# Altium PCB DC-DC_30KW_BUCK-BOOST.PcbDoc (part 2 of 2)
Units mm, origin at the board's own origin, x right, y up, seen from the top; angles counter-clockwise.
Board outline 250 x 400 mm, 4 copper layers (Top Layer 1, Top Layer, Bottom Layer, Bottom Layer 1), stack 0.603 mm thick; 286 components, 138 nets, 777 pads, 13 vias.
Unrouted connection lines stored in the file: 310.
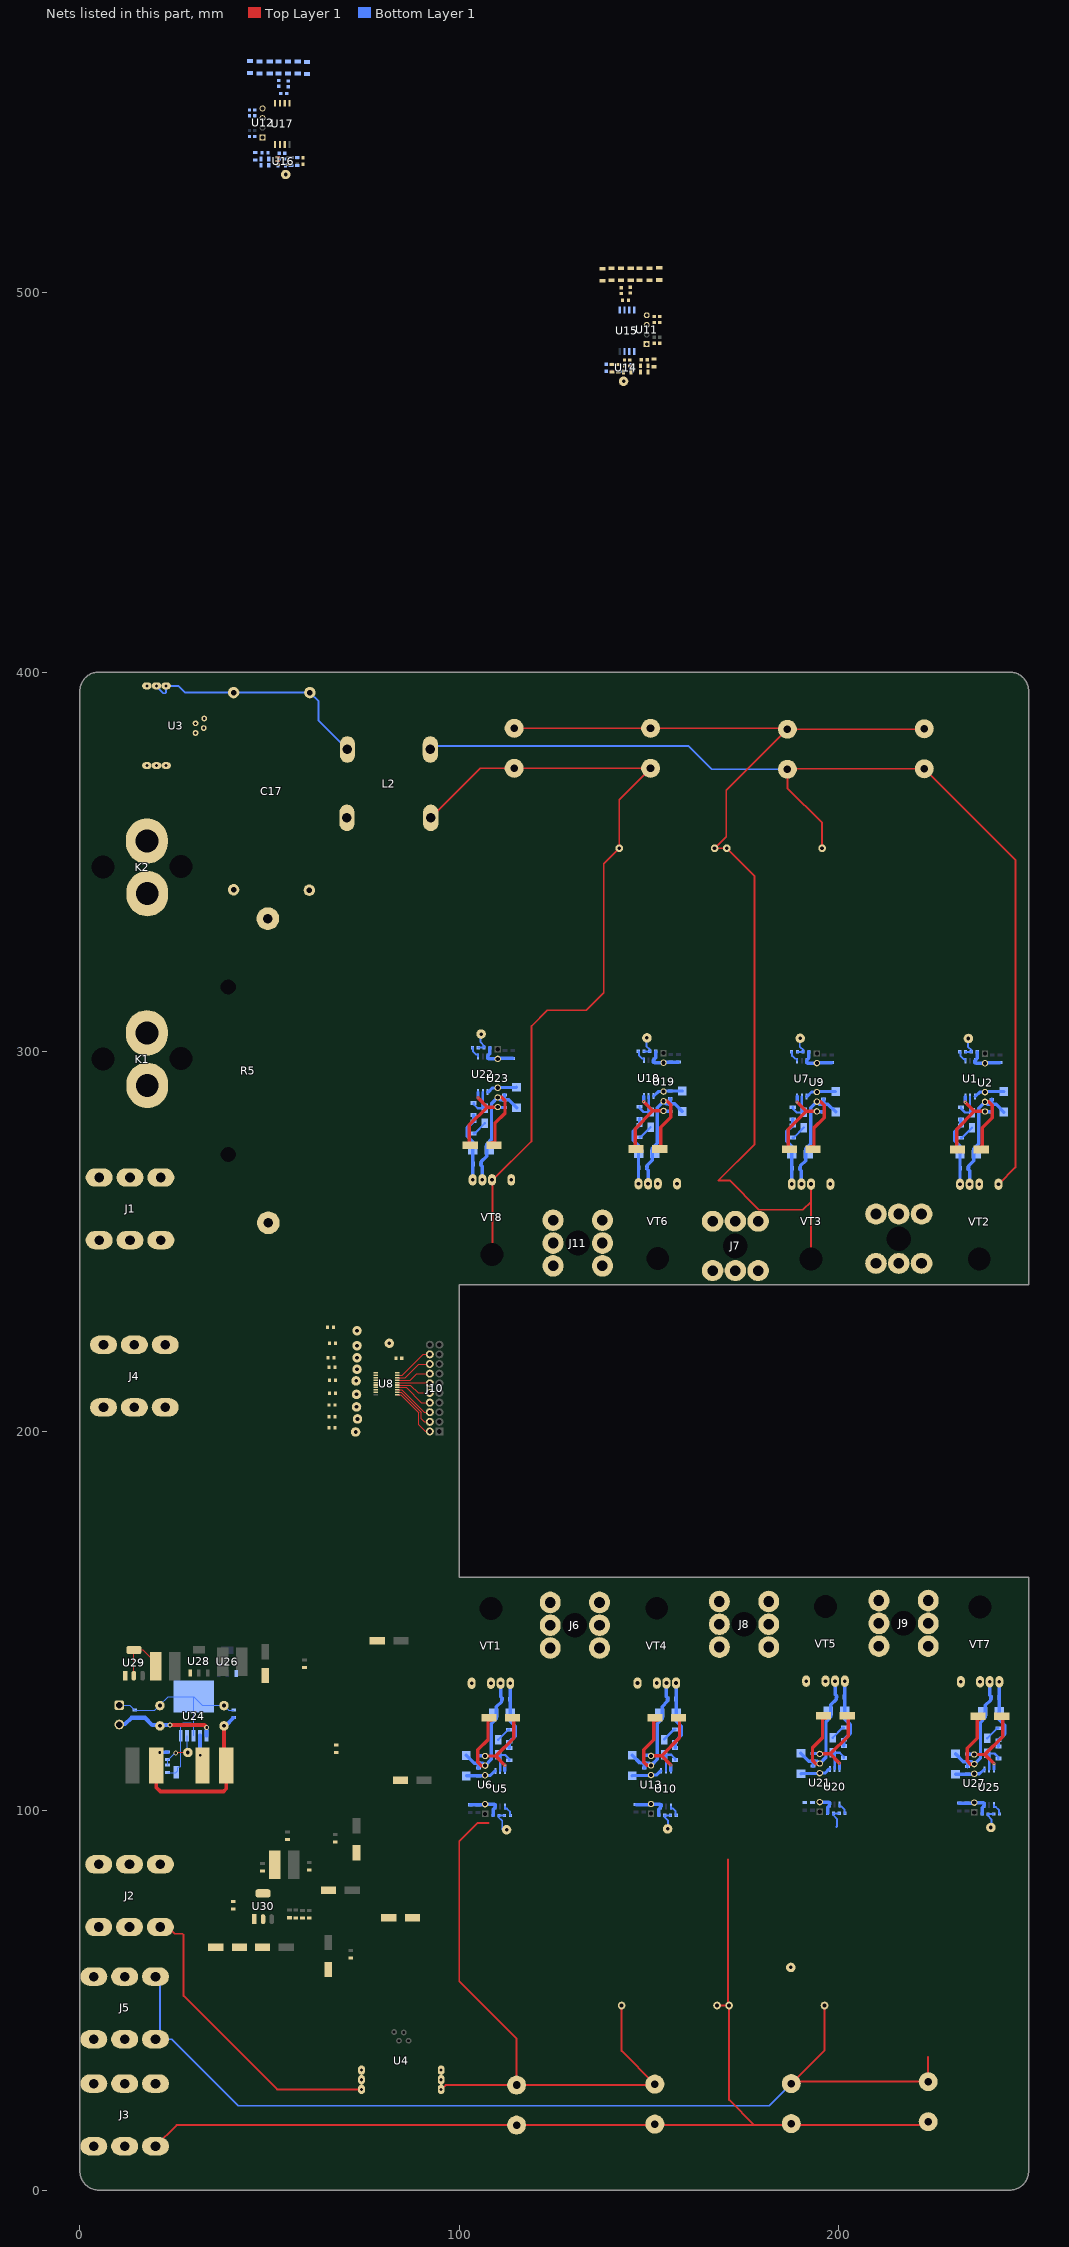
[diagram p3: the nets of this part, all layers, seen from the top]

## Via types
v1: diameter 0.6, hole 0.25, Top Layer 1 to Bottom Layer 1, tented both sides, 8 vias
v2: diameter 1.27, hole 0.711, Top Layer 1 to Bottom Layer 1, 5 vias

## Nets (pads, with @x,y where several pads share a name; then routed paths per layer and width w, separated by ;. In a path a pad name is that pad's centre, name@x,y a point inside that pad or via, vN(x,y) a via of type N, cw(c..) or ccw(c..) an arc to the next point about the centre after c; other vN are vias at no path point) (continued)
GND: C4.1 C12.1 C21.1 C23.1 C27.1 C29.1 C33.1 C36.1 C38.1 C39.1 C40.1 C41.1 C43.1 C44.1 C45.1 C47.1 C52.1 C53.1 C56.1 C57.1 C61.1 C63.1 C67.1 C69.1 C73.1 C74.2 C76.1 C77.1 C79.1 C80.1 C81.2 C84.1 C86.1 C87.1 C88.1 C89.2 C92.1 C93.2 C94.2 C95.1 C96.1 C97.2 C98.1 C99.2 C100.2 C101.1 C102.1 C103.2 C104.2 C105.1 C106.2 C107.1 C108.1 D15.2 P1.1 R14.1 R15.1 R16.1 R17.1 R18.1 R19.1 R20.1 R21.1 R22.1 R23.1 R24.1 R25.1 R26.1 R27.1 R28.1 R29.1 R30.1 R31.1 R52.1 R53.1 R77.1 U1.3 U2.2 U3.3 U5.3 U6.2 U7.3 U8.10 U9.2 U10.3 U11.1 U12.1 U13.2 U14.2 U15.5 U16.2 U17.5 U18.3 U19.2 U20.3 U21.2 U22.3 U23.2 U24.3 U24.5 U24.6 U25.3 U26.1 U27.2 U28.1 U29.1 U30.1 | length 138.6
  Bottom Layer 1 w0.3: P1.1@10.375,127.762 13.192,127.762 C77.1@14.478,126.476 19.669,126.476 21.082,127.889 23.251,130.058 U24.6@29.972,130.058 ; R77.1@23.114,109.998 23.13,109.982 23.495,109.982 23.511,109.998 25.289,109.998 D15.2@25.4,110.109 25.838,110.547 25.838,111.341 26.01,111.513 26.392,111.513 26.568,111.689 U24.5@26.568,119.753 26.568,122.58 27.178,123.19 29.21,123.19 29.972,122.428 ; U24.3@29.972,119.753 29.972,122.428 ; C79.1@40.513,126.476 39.259,126.476 37.973,127.762 32.268,127.762 U24.6@29.972,130.058 ; 29.972,122.428 U24.6@29.972,130.058
  Bottom Layer 1 w0.9: C69.1@102.856,101.545 C67.1@104.888,101.545 106.778,101.545 U6.2@106.921,101.688 ; U6.2@106.794,101.688 U6.2@106.921,101.688 ; R15.1@108.031,301.038 108.031,299.436 107.625,299.031 107.625,298.902 U22.3@107.442,298.719 107.442,298.224 107.459,298.207 107.629,298.207 107.752,298.084 U23.2@109.982,298.084 ; R20.1@108.872,98.733 108.872,100.335 109.277,100.741 109.277,100.869 U5.3@109.461,101.053 109.461,101.548 109.444,101.565 109.274,101.565 109.151,101.688 U6.2@106.921,101.688 ; U23.2@110.109,298.084 U23.2@109.982,298.084 ; C87.1@114.046,298.227 C84.1@112.014,298.227 110.125,298.227 U23.2@109.982,298.084 ; C63.1@146.558,101.584 C61.1@148.59,101.584 150.479,101.584 U13.2@150.622,101.727 ; U13.2@150.495,101.727 U13.2@150.622,101.727 ; R17.1@151.719,300.022 151.719,298.42 151.313,298.015 151.313,297.886 U18.3@151.13,297.703 151.13,297.208 151.147,297.191 151.317,297.191 151.44,297.068 U19.2@153.67,297.068 ; R18.1@152.573,98.773 152.573,100.375 152.979,100.78 152.979,100.909 U10.3@153.162,101.092 153.162,101.587 153.145,101.604 152.975,101.604 152.852,101.727 U13.2@150.622,101.727 ; U19.2@153.797,297.068 U19.2@153.67,297.068 ; C76.1@157.734,297.211 C73.1@155.702,297.211 153.813,297.211 U19.2@153.67,297.068 ; R19.1@192.105,299.913 192.105,298.311 191.699,297.906 191.699,297.777 U7.3@191.516,297.594 191.516,297.099 191.533,297.082 191.703,297.082 191.826,296.959 U9.2@194.056,296.959 ; U9.2@194.183,296.959 U9.2@194.056,296.959 ; U21.2@194.945,102.235 197.302,102.235 197.425,102.112 197.595,102.112 197.612,102.095 U20.3@197.612,101.6 197.429,101.417 197.429,101.288 197.023,100.883 R16.1@197.023,99.281 ; C47.1@198.12,297.102 C43.1@196.088,297.102 194.199,297.102 U9.2@194.056,296.959 ; C21.1@231.734,101.947 C12.1@233.766,101.947 235.655,101.947 U27.2@235.798,102.09 ; U27.2@235.671,102.09 U27.2@235.798,102.09 ; R21.1@236.428,299.88 236.428,298.278 236.022,297.873 236.022,297.744 U1.3@235.839,297.561 235.839,297.066 235.856,297.049 236.026,297.049 236.149,296.926 U2.2@238.379,296.926 ; R14.1@237.749,99.135 237.749,100.737 238.155,101.143 238.155,101.271 U25.3@238.338,101.455 238.338,101.95 238.321,101.967 238.151,101.967 238.028,102.09 U27.2@235.798,102.09 ; U2.2@238.506,296.926 U2.2@238.379,296.926 ; C27.1@242.443,297.069 C23.1@240.411,297.069 238.522,297.069 U2.2@238.379,296.926
"Net       _1": ?.1 VT2.2 VT3.1
NetC1_1: C1.1 C3.1 C7.2 C8.2 C16.1 C19.2 J3.1 J8.1 VT4.2 VT5.1 | length 282.4
  Top Layer 1 w0.5: J3.1@19.914,11.557 25.502,17.145 C8.2@115.062,17.145 177.673,17.145 ; C16.1@167.767,48.641 C16.1@167.894,48.641 C19.2@171.069,48.641 ; 170.815,87.122 170.815,48.895 C19.2@171.069,48.641 ; C3.1@223.52,18.034 222.631,17.145 177.673,17.145 ; C19.2@171.069,48.641 171.069,23.749 177.673,17.145
NetC1_2: C1.2 C3.2 C19.1 J5.1 R63.1 VT7.2 | length 259.9
  Top Layer 1 w0.5: C19.1@196.215,48.641 196.215,36.83 187.96,28.575 C3.2@223.52,28.575 223.52,35.052
  Bottom Layer 1 w0.5: J5.1@19.812,39.751 J5.1@21.082,39.751 ; J5.1@19.812,56.261 21.082,54.991 J5.1@21.082,39.751 ; C1.2@187.452,28.067 181.61,22.225 41.783,22.225 24.257,39.751 J5.1@21.082,39.751
NetC2_1: C2.1 C9.2 C13.1 C14.2 D2.1 R4.2 U2.6 VT2.3 | length 46.4
  Top Layer 1 w0.9: C9.2@236.885,274.858 237.733,274.858 237.769,274.893 237.769,279.933 240.411,282.575 240.411,285.877 239.522,286.766 U2.6@238.506,286.766
  Bottom Layer 1 w0.9: R4.2@234.045,269.24 234.045,269.015 234.442,268.618 VT2.3@234.442,265.049 ; R4.2@234.061,269.24 234.195,269.374 234.195,269.882 235.569,271.256 235.569,274.431 236.855,275.717 236.855,285.115 U2.6@238.506,286.766 239.157,286.115 C2.1@240.284,286.115 ; C14.2@240.284,287.433 C2.1@240.284,286.115 ; C13.1@243.459,284.066 241.41,286.115 C2.1@240.284,286.115
NetC2_2: C2.2 C9.1 U1.6 U2.7 | length 21.5
  Top Layer 1 w0.9: C9.1@231.14,274.32 231.013,274.447 231.013,279.527 235.712,284.226 ; v1(233.299,286.639) 235.712,284.226 ; U2.7@238.506,284.226 235.712,284.226
  Bottom Layer 1 w0.9: v1(233.299,286.639) U1.6@233.299,288.163 ; U2.7@238.506,284.226 238.617,284.115 C2.2@240.284,284.115
NetC5_1: C5.1 C10.1 C15.2 L2.4 VT2.1 | length 279
  Top Layer 1 w0.5: C15.2@195.58,353.568 195.58,360.299 186.436,369.443 C5.1@186.436,374.396 186.563,374.523 C10.1@222.504,374.523 246.507,350.52 246.507,269.494 VT2.1@242.062,265.049
  Bottom Layer 1 w0.5: L2.4@92.329,379.603 93.218,380.492 160.401,380.492 166.497,374.396 C5.1@186.436,374.396
NetC5_2: C5.2 C6.1 C10.2 C11.1 C15.1 C18.2 J7.1 VT3.2 VT6.1 | length 293.4
  Top Layer 1 w0.5: C11.1@114.427,385.191 C6.1@150.368,385.191 186.182,385.191 C5.2@186.436,384.937 ; VT3.2@192.659,245.382 192.659,260.477 ; VT3.2@192.659,265.082 192.659,260.477 ; C10.2@222.504,385.064 222.377,384.937 C5.2@186.436,384.937 ; C5.2@186.436,384.937 170.307,368.808 170.307,356.616 C18.2@167.259,353.568 C15.1@170.434,353.568 177.8,346.202 177.8,275.59 168.275,266.065 171.196,266.065 178.943,258.318 190.5,258.318 192.659,260.477
NetC6_2: C6.2 C11.2 C18.1 L2.2 VT8.2 | length 217.1
  Top Layer 1 w0.5: L2.2@92.456,361.569 105.537,374.65 C11.2@114.427,374.65 C6.2@150.368,374.65 142.113,366.395 C18.1@142.113,353.568 138.049,349.504 138.049,315.468 133.477,310.896 123.19,310.896 118.999,306.705 118.999,276.352 108.712,266.065 VT8.2@108.712,246.253 ; VT8.2@108.272,246.565 VT8.2@108.272,248.612
NetC7_1: C7.1 C8.1 C16.2 U4.8 U4.9 U4.10 VT1.1 | length 161.4
  Top Layer 1 w0.5: U4.8@95.209,26.543 96.352,27.686 C8.1@115.062,27.686 ; 107.637,96.705 104.706,96.705 99.949,91.948 99.949,54.991 115.062,39.878 C8.1@115.062,27.686 ; C16.2@142.748,48.641 142.748,36.703 C7.1@151.511,27.94 151.257,27.686 C8.1@115.062,27.686
NetC13_2: C13.2 C14.1 U1.4 U2.5 | length 8.2
  Bottom Layer 1 w0.8: U1.4@235.839,288.163 235.966,288.163 237.109,289.306 U2.5@238.506,289.306 238.633,289.433 C14.1@240.284,289.433 243.426,289.433 C13.2@243.459,289.466
NetC17_1: C17.1 J4.1 L2.1 R62.1
NetC17_2: C17.2 L2.3 U3.5 U3.6 U3.7 | length 62.9
  Bottom Layer 1 w0.5: U3.6@20.193,396.367 20.792,395.768 20.792,395.658 22.026,394.424 22.44,394.424 22.733,394.717 U3.5@22.733,396.367 25.929,396.367 27.707,394.589 C17.2@40.513,394.589 C17.2@60.579,394.589 62.909,392.259 62.909,387.179 L2.3@70.485,379.603
NetC20_1: C20.1 C22.2 C24.1 C25.2 D4.1 R9.2 U6.6 VT1.3 | length 46.4
  Top Layer 1 w0.9: U6.6@106.794,111.848 105.778,111.848 104.889,112.737 104.889,116.039 107.531,118.681 107.531,123.721 107.566,123.756 C22.2@108.415,123.756
  Bottom Layer 1 w0.9: C24.1@101.841,114.548 103.89,112.499 C20.1@105.016,112.499 ; C25.2@105.016,111.181 C20.1@105.016,112.499 ; VT1.3@110.858,133.565 110.858,129.996 111.255,129.599 R9.2@111.255,129.374 ; R9.2@111.239,129.374 111.105,129.24 111.105,128.732 109.731,127.358 109.731,125.691 109.731,124.183 108.445,122.897 108.445,113.499 U6.6@106.794,111.848 106.143,112.499 C20.1@105.016,112.499
NetC20_2: C20.2 C22.1 U5.6 U6.7 | length 21.5
  Top Layer 1 w0.9: U6.7@106.794,114.388 109.588,114.388 ; v1(112.001,111.975) 109.588,114.388 ; C22.1@114.16,124.294 114.287,124.167 114.287,119.087 109.588,114.388
  Bottom Layer 1 w0.9: C20.2@105.016,114.499 106.683,114.499 U6.7@106.794,114.388 ; U5.6@112.001,110.451 v1(112.001,111.975)
NetC24_2: C24.2 C25.1 U5.4 U6.5 | length 8.2
  Bottom Layer 1 w0.8: C24.2@101.841,109.148 101.874,109.181 C25.1@105.016,109.181 106.667,109.181 U6.5@106.794,109.308 108.191,109.308 109.334,110.451 U5.4@109.461,110.451
NetC26_1: C26.1 C28.2 C30.1 C31.2 D6.1 R13.2 U9.6 VT3.3 | length 46.4
  Top Layer 1 w0.9: C28.2@192.562,274.891 193.41,274.891 193.446,274.926 193.446,279.966 196.088,282.608 196.088,285.91 195.199,286.799 U9.6@194.183,286.799
  Bottom Layer 1 w0.9: R13.2@189.722,269.273 189.722,269.048 190.119,268.651 VT3.3@190.119,265.082 ; R13.2@189.738,269.273 189.872,269.407 189.872,269.915 191.246,271.289 191.246,274.464 192.532,275.75 192.532,285.148 U9.6@194.183,286.799 194.834,286.148 C26.1@195.961,286.148 ; C31.2@195.961,287.466 C26.1@195.961,286.148 ; C30.1@199.136,284.099 197.087,286.148 C26.1@195.961,286.148
NetC26_2: C26.2 C28.1 U7.6 U9.7 | length 21.5
  Top Layer 1 w0.9: C28.1@186.817,274.353 186.69,274.48 186.69,279.56 191.389,284.259 ; v1(188.976,286.672) 191.389,284.259 ; U9.7@194.183,284.259 191.389,284.259
  Bottom Layer 1 w0.9: v1(188.976,286.672) U7.6@188.976,288.196 ; U9.7@194.183,284.259 194.294,284.148 C26.2@195.961,284.148
NetC30_2: C30.2 C31.1 U7.4 U9.5 | length 8.2
  Bottom Layer 1 w0.8: U7.4@191.516,288.196 191.643,288.196 192.786,289.339 U9.5@194.183,289.339 194.31,289.466 C31.1@195.961,289.466 199.103,289.466 C30.2@199.136,289.499
NetC32_1: C32.1 C34.1 C54.1 R54.1 U11.3 U15.3 U15.4
NetC32_2: C32.2 C34.2 U11.4 U15.1
NetC35_1: C35.1 C37.1 C55.1 R55.1 U12.3 U17.3 U17.4
NetC35_2: C35.2 C37.2 U12.4 U17.1
NetC42_1: C42.1 C46.2 C49.1 C51.2 D8.1 R39.2 U13.6 VT4.3 | length 46.4
  Top Layer 1 w0.9: U13.6@150.495,111.887 149.479,111.887 148.59,112.776 148.59,116.078 151.232,118.72 151.232,123.76 151.268,123.795 C46.2@152.116,123.795
  Bottom Layer 1 w0.9: C49.1@145.542,114.587 147.591,112.538 C42.1@148.717,112.538 ; C51.2@148.717,111.22 C42.1@148.717,112.538 ; VT4.3@154.559,133.604 154.559,130.035 154.956,129.638 R39.2@154.956,129.413 ; R39.2@154.94,129.413 154.806,129.279 154.806,128.771 153.432,127.397 153.432,124.222 152.146,122.936 152.146,113.538 U13.6@150.495,111.887 149.844,112.538 C42.1@148.717,112.538
NetC42_2: C42.2 C46.1 U10.6 U13.7 | length 21.5
  Top Layer 1 w0.9: U13.7@150.495,114.427 153.289,114.427 ; v1(155.702,112.014) 153.289,114.427 ; C46.1@157.861,124.333 157.988,124.206 157.988,119.126 153.289,114.427
  Bottom Layer 1 w0.9: C42.2@148.717,114.538 150.384,114.538 U13.7@150.495,114.427 ; U10.6@155.702,110.49 v1(155.702,112.014)
NetC48_1: C48.1 C58.2 R50.1 R58.2 U14.4
NetC48_2: C48.2 C56.2 R42.1 R52.2 TP19.1 U14.3
NetC49_2: C49.2 C51.1 U10.4 U13.5 | length 8.2
  Bottom Layer 1 w0.8: C49.2@145.542,109.187 145.575,109.22 C51.1@148.717,109.22 150.368,109.22 U13.5@150.495,109.347 151.892,109.347 153.035,110.49 U10.4@153.162,110.49
NetC50_1: C50.1 C59.2 R51.1 R59.2 U16.4
NetC50_2: C50.2 C57.2 R43.1 R53.2 TP20.1 U16.3
NetC52_2: C52.2 R44.1
NetC53_2: C53.2 R45.1
NetC54_2: C54.2 R46.1 U15.2
NetC55_2: C55.2 R47.1 U17.2
NetC58_1: C58.1 R44.2 R58.1 U14.1
NetC59_1: C59.1 R45.2 R59.1 U16.1
NetC60_1: C60.1 C62.2 C64.1 C65.2 D10.1 R67.2 U19.6 VT6.3 | length 46.4
  Top Layer 1 w0.9: C62.2@152.176,275 153.024,275 153.06,275.035 153.06,280.075 155.702,282.717 155.702,286.019 154.813,286.908 U19.6@153.797,286.908
  Bottom Layer 1 w0.9: R67.2@149.336,269.382 149.336,269.157 149.733,268.76 VT6.3@149.733,265.191 ; R67.2@149.352,269.382 149.486,269.516 149.486,270.024 150.86,271.398 150.86,274.573 152.146,275.859 152.146,285.257 U19.6@153.797,286.908 154.448,286.257 C60.1@155.575,286.257 ; C65.2@155.575,287.575 C60.1@155.575,286.257 ; C64.1@158.75,284.208 156.701,286.257 C60.1@155.575,286.257
NetC60_2: C60.2 C62.1 U18.6 U19.7 | length 21.5
  Top Layer 1 w0.9: C62.1@146.431,274.462 146.304,274.589 146.304,279.669 151.003,284.368 ; v1(148.59,286.781) 151.003,284.368 ; U19.7@153.797,284.368 151.003,284.368
  Bottom Layer 1 w0.9: v1(148.59,286.781) U18.6@148.59,288.305 ; U19.7@153.797,284.368 153.908,284.257 C60.2@155.575,284.257
NetC64_2: C64.2 C65.1 U18.4 U19.5 | length 8.2
  Bottom Layer 1 w0.8: U18.4@151.13,288.305 151.257,288.305 152.4,289.448 U19.5@153.797,289.448 153.924,289.575 C65.1@155.575,289.575 158.717,289.575 C64.2@158.75,289.608
NetC66_1: C66.1 C68.2 C70.1 C71.2 D12.1 R71.2 U21.6 VT5.3 | length 46.4
  Top Layer 1 w0.9: U21.6@194.945,112.395 193.929,112.395 193.04,113.284 193.04,116.586 195.682,119.228 195.682,124.268 195.718,124.303 C68.2@196.566,124.303
  Bottom Layer 1 w0.9: C70.1@189.992,115.095 192.041,113.046 C66.1@193.167,113.046 ; C71.2@193.167,111.728 C66.1@193.167,113.046 ; VT5.3@199.009,134.112 199.009,130.543 199.406,130.146 R71.2@199.406,129.921 ; R71.2@199.39,129.921 199.256,129.787 199.256,129.279 197.882,127.905 197.882,124.73 196.596,123.444 196.596,114.046 U21.6@194.945,112.395 194.294,113.046 C66.1@193.167,113.046
NetC66_2: C66.2 C68.1 U20.6 U21.7 | length 21.5
  Top Layer 1 w0.9: U21.7@194.945,114.935 197.739,114.935 ; v1(200.152,112.522) 197.739,114.935 ; C68.1@202.311,124.841 202.438,124.714 202.438,119.634 197.739,114.935
  Bottom Layer 1 w0.9: C66.2@193.167,115.046 194.834,115.046 U21.7@194.945,114.935 ; U20.6@200.152,110.998 v1(200.152,112.522)
NetC70_2: C70.2 C71.1 U20.4 U21.5 | length 8.2
  Bottom Layer 1 w0.8: C70.2@189.992,109.695 190.025,109.728 C71.1@193.167,109.728 194.818,109.728 U21.5@194.945,109.855 196.342,109.855 197.485,110.998 U20.4@197.612,110.998
NetC72_1: C72.1 C75.2 C78.1 C82.2 D14.1 R75.2 U23.6 VT8.3 | length 46.4
  Top Layer 1 w0.9: C75.2@108.488,276.016 109.336,276.016 109.372,276.051 109.372,281.091 112.014,283.733 112.014,287.035 111.125,287.924 U23.6@110.109,287.924
  Bottom Layer 1 w0.9: R75.2@105.648,270.398 105.648,270.173 106.045,269.776 VT8.3@106.045,266.207 ; R75.2@105.664,270.398 105.798,270.532 105.798,271.04 107.172,272.414 107.172,274.081 107.172,275.589 108.458,276.875 108.458,286.273 U23.6@110.109,287.924 110.76,287.273 C72.1@111.887,287.273 ; C82.2@111.887,288.591 C72.1@111.887,287.273 ; C78.1@115.062,285.224 113.013,287.273 C72.1@111.887,287.273
NetC72_2: C72.2 C75.1 U22.6 U23.7 | length 21.5
  Top Layer 1 w0.9: C75.1@102.743,275.478 102.616,275.605 102.616,280.685 107.315,285.384 ; v1(104.902,287.797) 107.315,285.384 ; U23.7@110.109,285.384 107.315,285.384
  Bottom Layer 1 w0.9: v1(104.902,287.797) U22.6@104.902,289.321 ; U23.7@110.109,285.384 110.22,285.273 C72.2@111.887,285.273
NetC78_2: C78.2 C82.1 U22.4 U23.5 | length 8.2
  Bottom Layer 1 w0.8: U22.4@107.442,289.321 107.569,289.321 108.712,290.464 U23.5@110.109,290.464 110.236,290.591 C82.1@111.887,290.591 115.029,290.591 C78.2@115.062,290.624
NetC79_2: C79.2 C81.1 L4.2 L5.1 R76.2 | length 47.3
  Top Layer 1 w1: L5.1@20.143,111.887 20.143,106.095 21.209,105.029 37.846,105.029 38.558,105.741 L4.2@38.558,111.887 37.973,112.472 C81.1@37.973,122.333 C81.1@37.973,122.428
  Bottom Layer 1 w1: v2(21.082,115.316) 21.138,115.372 R76.2@23.059,115.372 ; C81.1@37.973,122.428 38.465,122.428 C79.2@40.513,124.476
NetC83_1: C83.1 C85.2 C90.1 C91.2 D17.1 R81.2 U27.6 VT7.3 | length 46.4
  Top Layer 1 w0.9: U27.6@235.671,112.25 234.655,112.25 233.766,113.139 233.766,116.441 236.409,119.083 236.409,124.123 236.444,124.158 C85.2@237.292,124.158
  Bottom Layer 1 w0.9: C90.1@230.718,114.95 232.767,112.901 C83.1@233.893,112.901 ; C91.2@233.893,111.583 C83.1@233.893,112.901 ; VT7.3@239.735,133.967 239.735,130.398 240.132,130.001 R81.2@240.132,129.776 ; R81.2@240.116,129.776 239.982,129.642 239.982,129.134 238.608,127.76 238.608,124.585 237.322,123.299 237.322,113.901 U27.6@235.671,112.25 235.02,112.901 C83.1@233.893,112.901
NetC83_2: C83.2 C85.1 U25.6 U27.7 | length 21.5
  Top Layer 1 w0.9: U27.7@235.671,114.79 238.465,114.79 ; v1(240.878,112.377) 238.465,114.79 ; C85.1@243.037,124.696 243.164,124.569 243.164,119.489 238.465,114.79
  Bottom Layer 1 w0.9: C83.2@233.893,114.901 235.56,114.901 U27.7@235.671,114.79 ; U25.6@240.878,110.853 v1(240.878,112.377)
NetC90_2: C90.2 C91.1 U25.4 U27.5 | length 8.2
  Bottom Layer 1 w0.8: C90.2@230.718,109.55 230.751,109.583 C91.1@233.893,109.583 235.544,109.583 U27.5@235.671,109.71 237.068,109.71 238.211,110.853 U25.4@238.338,110.853
NetC99_1: C99.1 C101.2 L7.1 U29.2 | length 14.8
  Top Layer 1 w0.3: U29.2@14.224,135.543 U29.2@14.224,142.333 16.544,142.333 19.979,138.898 L7.1@19.979,138.049
NetC106_1: C106.1 C107.2 L8.1 U30.2
NetD1_1: D1.1 R3.2 U1.5 | length 8.1
  Bottom Layer 1 w0.6: R3.2@232.156,285.318 232.156,284.988 233.204,283.94 D1.1@235.077,283.94 234.569,284.448 U1.5@234.569,288.163
NetD1_2: D1.2 R1.2 | length 4
  Bottom Layer 1 w0.6: R1.2@232.156,277.292 232.429,277.292 D1.2@235.077,279.94
NetD2_2: D2.2 R1.1 R3.1 R4.1 VT2.4 | length 18.3
  Bottom Layer 1 w0.9: VT2.4@231.902,265.049 231.902,269.24 231.902,270.891 231.902,275.082 230.505,276.479 230.505,278.841 R1.1@232.156,280.492 R3.1@232.156,282.118
NetD3_1: D3.1 R8.2 U5.5 | length 8.1
  Bottom Layer 1 w0.6: U5.5@110.731,110.451 110.731,114.166 D3.1@110.223,114.674 112.096,114.674 113.144,113.626 R8.2@113.144,113.296
NetD3_2: D3.2 R6.2 | length 4
  Bottom Layer 1 w0.6: D3.2@110.223,118.674 112.871,121.322 R6.2@113.144,121.322
NetD4_2: D4.2 R6.1 R8.1 R9.1 VT1.4 | length 18.3
  Bottom Layer 1 w0.9: R8.1@113.144,116.496 R6.1@113.144,118.122 114.795,119.773 114.795,122.135 113.398,123.532 113.398,125.691 113.398,127.723 113.398,129.374 VT1.4@113.398,133.565
NetD5_1: D5.1 R12.2 U7.5 | length 8.1
  Bottom Layer 1 w0.6: R12.2@187.833,285.351 187.833,285.021 188.881,283.973 D5.1@190.754,283.973 190.246,284.481 U7.5@190.246,288.196
NetD5_2: D5.2 R10.2 | length 4
  Bottom Layer 1 w0.6: R10.2@187.833,277.325 188.106,277.325 D5.2@190.754,279.973
NetD6_2: D6.2 R10.1 R12.1 R13.1 VT3.4 | length 18.3
  Bottom Layer 1 w0.9: VT3.4@187.579,265.082 187.579,269.273 187.579,270.924 187.579,275.115 186.182,276.512 186.182,278.874 R10.1@187.833,280.525 R12.1@187.833,282.151
NetD7_1: D7.1 R36.2 U10.5 | length 8.1
  Bottom Layer 1 w0.6: U10.5@154.432,110.49 154.432,114.205 D7.1@153.924,114.713 155.797,114.713 156.845,113.665 R36.2@156.845,113.335
NetD7_2: D7.2 R34.2 | length 4
  Bottom Layer 1 w0.6: D7.2@153.924,118.713 156.572,121.361 R34.2@156.845,121.361
NetD8_2: D8.2 R34.1 R36.1 R39.1 VT4.4 | length 18.3
  Bottom Layer 1 w0.9: R36.1@156.845,116.535 R34.1@156.845,118.161 158.496,119.812 158.496,122.174 157.099,123.571 157.099,127.762 157.099,129.413 VT4.4@157.099,133.604
NetD9_1: D9.1 R66.2 U18.5 | length 8.1
  Bottom Layer 1 w0.6: R66.2@147.447,285.46 147.447,285.13 148.495,284.082 D9.1@150.368,284.082 149.86,284.59 U18.5@149.86,288.305
NetD9_2: D9.2 R64.2 | length 4
  Bottom Layer 1 w0.6: R64.2@147.447,277.434 147.72,277.434 D9.2@150.368,280.082
NetD10_2: D10.2 R64.1 R66.1 R67.1 VT6.4 | length 18.3
  Bottom Layer 1 w0.9: VT6.4@147.193,265.191 147.193,269.382 147.193,271.033 147.193,275.224 145.796,276.621 145.796,278.983 R64.1@147.447,280.634 R66.1@147.447,282.26
NetD11_1: D11.1 R70.2 U20.5 | length 8.1
  Bottom Layer 1 w0.6: U20.5@198.882,110.998 198.882,114.713 D11.1@198.374,115.221 200.247,115.221 201.295,114.173 R70.2@201.295,113.843
NetD11_2: D11.2 R68.2 | length 4
  Bottom Layer 1 w0.6: D11.2@198.374,119.221 201.022,121.869 R68.2@201.295,121.869
NetD12_2: D12.2 R68.1 R70.1 R71.1 VT5.4 | length 18.3
  Bottom Layer 1 w0.9: R70.1@201.295,117.043 R68.1@201.295,118.669 202.946,120.32 202.946,122.682 201.549,124.079 201.549,128.27 201.549,129.921 VT5.4@201.549,134.112
NetD13_1: D13.1 R74.2 U22.5 | length 8.1
  Bottom Layer 1 w0.6: R74.2@103.759,286.476 103.759,286.146 104.807,285.098 D13.1@106.68,285.098 106.172,285.606 U22.5@106.172,289.321
NetD13_2: D13.2 R72.2 | length 4
  Bottom Layer 1 w0.6: R72.2@103.759,278.45 104.032,278.45 D13.2@106.68,281.098
NetD14_2: D14.2 R72.1 R74.1 R75.1 VT8.4 | length 18.3
  Bottom Layer 1 w0.9: VT8.4@103.505,266.207 103.505,270.398 103.505,272.049 103.505,274.081 103.505,276.24 102.108,277.637 102.108,279.999 R72.1@103.759,281.65 R74.1@103.759,283.276
NetD15_1: D15.1 L4.1 U24.2 | length 9.7
  Bottom Layer 1 w0.3: D15.1@31.61,110.109 D15.1@31.75,110.249
  Bottom Layer 1 w1: U24.2@31.674,119.753 31.674,114.703 31.75,114.627 v2(31.75,114.554) D15.1@31.75,110.249
NetD16_1: D16.1 R80.2 U25.5 | length 8.1
  Bottom Layer 1 w0.6: U25.5@239.608,110.853 239.608,114.568 D16.1@239.1,115.076 240.973,115.076 242.021,114.028 R80.2@242.021,113.698
NetD16_2: D16.2 R78.2 | length 4
  Bottom Layer 1 w0.6: D16.2@239.1,119.076 241.748,121.724 R78.2@242.021,121.724
NetD17_2: D17.2 R78.1 R80.1 R81.1 VT7.4 | length 18.3
  Bottom Layer 1 w0.9: R80.1@242.021,116.898 R78.1@242.021,118.524 243.672,120.175 243.672,122.537 242.275,123.934 242.275,128.125 242.275,129.776 VT7.4@242.275,133.967
NetJ1_1: J1.1 K1.2 R5.1 R32.2
NetJ2_1: J2.1 R33.2 U4.5 U4.6 U4.7 | length 80.2
  Top Layer 1 w0.5: J2.1@21.209,69.342 23.269,69.342 25.047,67.564 27.012,67.564 27.305,67.271 27.305,51.181 51.943,26.543 U4.7@74.209,26.543
NetJ6_1: J6.1 VT1.2 VT4.1
NetJ9_1: J9.1 VT5.2 VT7.1
NetJ10_2: J10.2 R23.2 TP2.1 U8.1 | length 14.4
  Top Layer 1 w0.3: U8.1@83.622,209.546 84.586,209.546 89.281,204.851 89.281,201.676 91.059,199.898 J10.2@92.202,199.898
NetJ10_4: J10.4 R31.2 TP10.1 U8.2 | length 12.8
  Top Layer 1 w0.3: U8.2@83.622,210.196 84.698,210.196 89.916,204.978 89.916,203.2 90.678,202.438 J10.4@92.202,202.438
NetJ10_6: J10.6 R30.2 TP9.1 U8.3 | length 11
  Top Layer 1 w0.3: U8.3@83.622,210.846 84.81,210.846 90.678,204.978 J10.6@92.202,204.978
NetJ10_8: J10.8 R29.2 TP8.1 U8.4 | length 10.2
  Top Layer 1 w0.3: U8.4@83.622,211.496 85.938,211.496 89.916,207.518 J10.8@92.202,207.518
NetJ10_10: J10.10 R28.2 TP7.1 U8.5 | length 9.4
  Top Layer 1 w0.3: U8.5@83.622,212.146 87.066,212.146 89.154,210.058 J10.10@92.202,210.058
NetJ10_12: J10.12 R27.2 TP6.1 U8.6 | length 8.7
  Top Layer 1 w0.3: U8.6@83.622,212.796 92.004,212.796 J10.12@92.202,212.598
NetJ10_14: J10.14 R26.2 TP5.1 U8.7 | length 9.3
  Top Layer 1 w0.3: U8.7@83.622,213.446 87.081,213.446 88.773,215.138 J10.14@92.202,215.138
NetJ10_16: J10.16 R25.2 TP4.1 U8.8 | length 10.1
  Top Layer 1 w0.3: U8.8@83.622,214.096 85.699,214.096 89.281,217.678 J10.16@92.202,217.678
NetJ10_18: J10.18 R24.2 TP3.1 U8.9 | length 10.8
  Top Layer 1 w0.3: U8.9@83.622,214.746 84.952,214.746 90.424,220.218 J10.18@92.202,220.218
NetJ11_1: J11.1 VT6.2 VT8.1
NetK1_1: K1.1 K2.2 R5.2
NetK2_1: K2.1 U3.8 U3.9 U3.10
NetR2_1: R2.1 R21.2 TP18.1 U8.18 | length 5.6
  Bottom Layer 1 w0.5: R2.1@233.38,299.905 235.005,299.905 235.005,300.299 234.002,301.302 234.002,303.334 TP18.1@234.129,303.461
NetR2_2: R2.2 U1.1 | length 3.2
  Bottom Layer 1 w0.5: R2.2@231.83,299.905 232.005,299.73 232.005,298.85 232.782,298.073 233.282,298.073 U1.1@233.282,297.572
NetR7_1: R7.1 R20.2 TP17.1 U8.17 | length 5.6
  Bottom Layer 1 w0.5: 111.171,95.152 111.298,95.279 111.298,97.311 110.295,98.314 110.295,98.708 R7.1@111.92,98.708
NetR7_2: R7.2 U5.1 | length 3.2
  Bottom Layer 1 w0.5: U5.1@112.017,101.041 112.017,100.541 112.518,100.541 113.295,99.764 113.295,98.883 R7.2@113.47,98.708
NetR11_1: R11.1 R19.2 TP16.1 U8.16 | length 5.6
  Bottom Layer 1 w0.5: R11.1@189.057,299.938 190.682,299.938 190.682,300.332 189.679,301.335 189.679,303.367 TP16.1@189.806,303.494
NetR11_2: R11.2 U7.1 | length 3.2
  Bottom Layer 1 w0.5: R11.2@187.507,299.938 187.682,299.763 187.682,298.883 188.459,298.106 188.959,298.106 U7.1@188.959,297.605
NetR14_2: R14.2 R79.1 TP11.1 U8.11 | length 5.6
  Bottom Layer 1 w0.5: TP11.1@240.048,95.554 240.175,95.681 240.175,97.713 239.172,98.716 239.172,99.11 R79.1@240.797,99.11
NetR15_2: R15.2 R73.1 TP12.1 U8.12 | length 5.6
  Bottom Layer 1 w0.5: R73.1@104.983,301.063 106.608,301.063 106.608,301.457 105.605,302.46 105.605,304.492 TP12.1@105.732,304.619
NetR16_2: R16.2 R69.1 TP13.1 U8.13 | length 5.6
  Bottom Layer 1 w0.5: 199.322,95.7 199.449,95.827 199.449,97.859 198.446,98.862 198.446,99.256 R69.1@200.071,99.256
NetR17_2: R17.2 R65.1 TP14.1 U8.14 | length 5.6
  Bottom Layer 1 w0.5: R65.1@148.671,300.047 150.296,300.047 150.296,300.441 149.293,301.444 149.293,303.476 TP14.1@149.42,303.603
NetR18_2: R18.2 R35.1 TP15.1 U8.15 | length 5.6
  Bottom Layer 1 w0.5: TP15.1@154.872,95.192 154.999,95.319 154.999,97.351 153.996,98.354 153.996,98.748 R35.1@155.621,98.748
NetR22_2: R22.2 TP1.1 U8.19
NetR32_1: R32.1 R37.2
NetR33_1: R33.1 R38.2
NetR35_2: R35.2 U10.1 | length 3.2
  Bottom Layer 1 w0.5: U10.1@155.719,101.081 155.719,100.58 156.219,100.58 156.996,99.803 156.996,98.923 R35.2@157.171,98.748
NetR37_1: R37.1 R40.2
NetR38_1: R38.1 R41.2
NetR40_1: R40.1 R46.2 R48.2
NetR41_1: R41.1 R47.2 R49.2
NetR42_2: R42.2 U15.7
NetR43_2: R43.2 U17.7
NetR48_1: R48.1 R54.2 R56.2
NetR49_1: R49.1 R55.2 R57.2
NetR50_2: R50.2 U15.6
NetR51_2: R51.2 U17.6
NetR56_1: R56.1 R60.2
NetR57_1: R57.1 R61.2
NetR60_1: R60.1 R62.2
NetR61_1: R61.1 R63.2
NetR65_2: R65.2 U18.1 | length 3.2
  Bottom Layer 1 w0.5: R65.2@147.121,300.047 147.296,299.872 147.296,298.992 148.073,298.215 148.573,298.215 U18.1@148.573,297.714
NetR69_2: R69.2 U20.1 | length 3.2
  Bottom Layer 1 w0.5: U20.1@200.169,101.589 200.169,101.088 200.669,101.088 201.446,100.311 201.446,99.431 R69.2@201.621,99.256
NetR73_2: R73.2 U22.1 | length 3.2
  Bottom Layer 1 w0.5: R73.2@103.433,301.063 103.608,300.888 103.608,300.008 104.385,299.231 104.885,299.231 U22.1@104.885,298.73
NetR76_1: R76.1 R77.2 TP21.1 U24.4 | length 12.1
  Top Layer 1 w0.3: v2(25.273,115.189) 25.4,115.316 TP21.1@28.448,115.316
  Bottom Layer 1 w0.3: R77.2@23.114,111.998 R76.1@23.114,113.427 23.339,113.427 25.101,115.189 v2(25.273,115.189) ; U24.4@28.27,119.753 28.27,115.494 TP21.1@28.448,115.316
NetR79_2: R79.2 U25.1 | length 3.2
  Bottom Layer 1 w0.5: U25.1@240.895,101.443 240.895,100.943 241.395,100.943 242.172,100.166 242.172,99.285 R79.2@242.347,99.11
NetU3_1: U3.1
NetU3_2: U3.2
NetU3_4: U3.4
VCC: C74.1 C77.2 P1.2 U24.1 | length 27
  Top Layer 1 w1.1: v2(23.749,122.555) 32.766,122.555 v2(33.401,121.92)
  Bottom Layer 1 w1.1: P1.2@10.375,122.682 10.488,122.795 11.924,122.795 13.579,124.45 14.451,124.45 C77.2@14.478,124.476 17.129,124.476 19.05,122.555 21.082,122.555 v2(23.749,122.555) ; U24.1@33.376,119.753 33.401,119.778 v2(33.401,121.92)
pads on no net: ?.0 J6.0 J7.0 J8.0 J9.0 J10.1 J10.3 J10.5 J10.7 J10.9 J10.11 J10.13 J10.15 J10.17 J10.19 J10.20 J11.0 K1.0 K2.0 R5.0 U1.2 U4.1 U4.2 U4.3 U4.4 U5.2 U7.2 U10.2 U18.2 U20.2 U22.2 U25.2

## Polygon pours and split planes (outlines as drawn)
NetC5_1 on Bottom Layer "NETC5_1_L03_P000" (solid, pour order 0): 183.388,377.825 247.396,377.825 249.809,375.412 249.809,243.84 244.538,238.569 242.443,240.665 242.443,248.539 239.522,251.46 239.522,276.86 240.919,278.257 240.919,346.583 195.834,346.583 183.388,359.029

## Silkscreen, mask and mechanical layers (free items; w line width, h text height)
Mechanical 1:
  circle w0.013: c5.006,395.006 r1.5
  circle w0.013: c245.006,395.006 r1.5
  circle w0.013: c245.006,5.006 r1.5
  circle w0.013: c5.006,5.006 r1.5
  circle w0.013: c5.006,395.006 r1.5
  circle w0.013: c245.006,395.006 r1.5
  circle w0.013: c245.006,5.006 r1.5
  circle w0.013: c5.006,5.006 r1.5
  circle w0.013: c5.006,5.006 r1.5
  circle w0.013: c5.006,395.006 r1.5
  circle w0.013: c237.518,154.834 r1.75
  circle w0.013: c237.518,103.834 r1.75
  circle w0.013: c237.744,153.416 r1.75
  circle w0.013: c237.744,102.416 r1.75
  circle w0.013: c245.006,5.006 r1.5
  circle w0.013: c192.799,245.414 r1.75
  circle w0.013: c151.724,245.742 r1.75
  circle w0.013: c192.11,245.633 r1.75
  circle w0.013: c151.585,245.683 r1.75
  circle w0.013: c108.867,153.014 r1.75
  circle w0.013: c108.204,153.797 r1.75
  circle w0.013: c108.204,102.797 r1.75
  circle w0.013: c108.867,102.014 r1.75
  circle w0.013: c197.018,153.561 r1.75
  circle w0.013: c196.36,153.455 r1.75
  circle w0.013: c152.568,153.053 r1.75
  circle w0.013: c151.585,153.836 r1.75
  circle w0.013: c108.036,246.758 r1.75
  circle w0.013: c108.655,246.048 r1.75
  circle w0.013: c196.36,102.455 r1.75
  circle w0.013: c197.018,102.561 r1.75
  circle w0.013: c151.585,102.836 r1.75
  circle w0.013: c152.568,102.053 r1.75
  circle w0.013: c245.006,395.006 r1.5
  circle w0.013: c236.433,296.6 r1.75
  circle w0.013: c236.433,245.6 r1.75
  circle w0.013: c192.799,296.414 r1.75
  circle w0.013: c151.724,296.742 r1.75
  circle w0.013: c192.11,296.633 r1.75
  circle w0.013: c151.585,296.683 r1.75
  circle w0.013: c108.036,297.758 r1.75
  circle w0.013: c108.655,297.048 r1.75
  lines w0.013: 0.006,5.006 ccw(c5.006,5.006) 5.006,0.006 ; 0.006,5.006 ccw(c5.006,5.006) 5.006,0.006 ; 0.006,5.006 ccw(c5.006,5.006) 5.006,0.006 ; 0.006,5.006 0.006,395.006 ; 0.006,395.006 cw(c5.006,395.006) 5.006,400.006 ; 0.006,395.006 cw(c5.006,395.006) 5.006,400.006 ; 0.006,395.006 cw(c5.006,395.006) 5.006,400.006 ; 5.006,0.006 245.006,0.006 ; 5.006,400.006 245.006,400.006 ; 245.006,0.006 ccw(c245.006,5.006) 250.006,5.006 ; 245.006,0.006 ccw(c245.006,5.006) 250.006,5.006 ; 245.006,0.006 ccw(c245.006,5.006) 250.006,5.006 ; 245.006,400.006 cw(c245.006,395.006) 250.006,395.006 ; 245.006,400.006 cw(c245.006,395.006) 250.006,395.006 ; 245.006,400.006 cw(c245.006,395.006) 250.006,395.006 ; 250.006,5.006 250.006,161.506 100.006,161.506 100.006,238.506 250.006,238.506 250.006,395.006

## Dimensions
100.006,161.506 to 250.006,161.506 on Top Layer 1

## Text inside footprints (layer, text, board x,y; h text height)
C74: Top Overlay "-" at 19.558,127.794 h1.52 r90; Top Overlay "+" at 19.558,121.063 h1.52 r90
C81: Top Overlay "-" at 36.449,127.794 h1.52 r90; Top Overlay "+" at 36.449,121.063 h1.52 r90
U1: Bottom Overlay "*" at 232.893,298.132 h1.27 r90; Mechanical 13 "*" at 233.998,296.545 h1.27 r90
U3: Top Overlay "VCC" at 32.079,383.529 h0.6; Top Overlay "GND" at 27.71,386.145 h0.6; Top Overlay "Vref" at 27.456,383.579 h0.6; Top Overlay "Vout" at 31.444,388.888 h0.6
U4: Top Overlay "VCC" at 87.047,40.969 h0.6 r90; Top Overlay "GND" at 84.431,36.6 h0.6 r90; Top Overlay "Vref" at 86.997,36.346 h0.6 r90; Top Overlay "Vout" at 81.688,40.334 h0.6 r90
U5: Bottom Overlay "*" at 112.407,100.481 h1.27 r270; Mechanical 13 "*" at 111.302,102.069 h1.27 r270
U7: Bottom Overlay "*" at 188.57,298.165 h1.27 r90; Mechanical 13 "*" at 189.674,296.578 h1.27 r90
U10: Bottom Overlay "*" at 156.108,100.52 h1.27 r270; Mechanical 13 "*" at 155.004,102.108 h1.27 r270
U18: Bottom Overlay "*" at 148.184,298.275 h1.27 r90; Mechanical 13 "*" at 149.288,296.687 h1.27 r90
U20: Bottom Overlay "*" at 200.558,101.028 h1.27 r270; Mechanical 13 "*" at 199.453,102.616 h1.27 r270
U22: Bottom Overlay "*" at 104.496,299.291 h1.27 r90; Mechanical 13 "*" at 105.6,297.703 h1.27 r90
U25: Bottom Overlay "*" at 241.284,100.883 h1.27 r270; Mechanical 13 "*" at 240.18,102.471 h1.27 r270